# Altium PCB Main-Controller-Board-PCB.PcbDoc (part 2 of 2)
Units mm, origin at the board's own origin, x right, y up, seen from the top; angles counter-clockwise.
Board outline 97 x 32 mm, 2 copper layers (Top Layer, Bottom Layer), stack 1.57 mm thick; 70 components, 40 nets, 208 pads, 98 vias.
Unrouted connection lines stored in the file: 10.
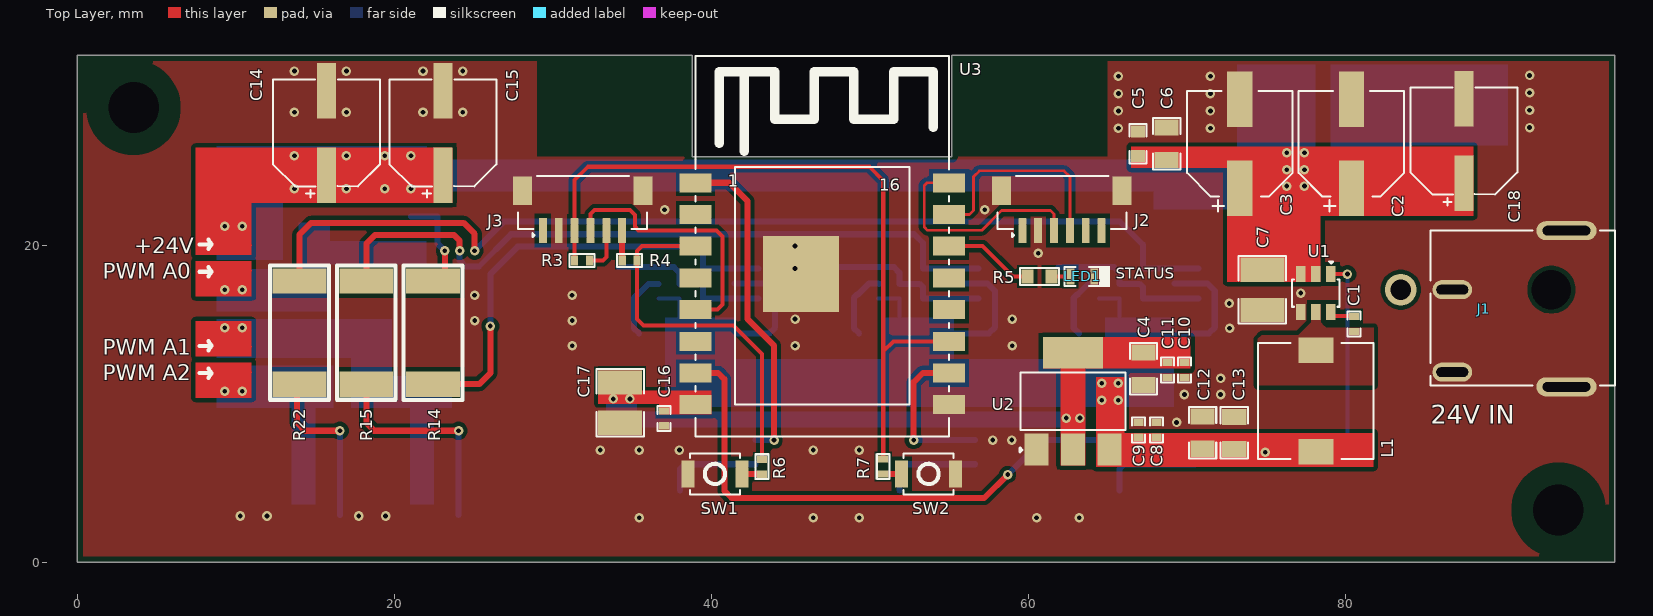
[diagram p0: Top Layer view]

## Via types
v1: diameter 0.6, hole 0.3, Top Layer to Bottom Layer, 98 vias

## Nets (pads, with @x,y where several pads share a name; then routed paths per layer and width w, separated by ;. In a path a pad name is that pad's centre, name@x,y a point inside that pad or via, vN(x,y) a via of type N, cw(c..) or ccw(c..) an arc to the next point about the centre after c; other vN are vias at no path point) (continued)
NetQ2_2: (continued)
  Bottom Layer w0.381: v1(24.134,19.66) 24.134,19.057 24.524,18.667 25.35,18.667 27.383,20.7 52.806,20.7 53.36,20.146 Q2.2 Q6.2
NetQ3_1: Q3.1 R8.1 U5.6 | length 4.4
  Bottom Layer w0.381: U5.6 35.117,14.782 Q3.1@35.117,16.683 ; R8.1 36.057,17.573 35.386,16.903 35.336,16.903 Q3.1@35.117,16.683 ; Q3.1@35.117,16.683 Q3.1 Q3.1@35.117,16.683
NetQ4_1: Q4.1 R10.1 U6.6 | length 4.5
  Bottom Layer w0.381: U6.6 48.993,14.782 Q4.1@48.993,16.683 ; R10.1@50.573,17.573 50.549,17.597 49.957,17.597 49.262,16.903 49.212,16.903 Q4.1@48.993,16.683 ; Q4.1@48.993,16.683 Q4.1 Q4.1@48.993,16.683
NetQ7_1: Q7.1 Q9.3 Q11.1 R17.1 | length 10.5
  Bottom Layer w0.381: Q9.3 65.398,18.633 65.748,18.284 65.748,17.573 67.023,17.573 67.236,17.36 Q7.1 Q11.1
NetQ7_2: Q7.2 Q11.2 R22.1 | length 64.2
  Top Layer w0.381: R22.1 14.024,20.679 14.763,21.418 24.377,21.418 25.07,20.726 v1(25.07,19.66)
  Bottom Layer w0.381: v1(25.07,19.66) 26.903,21.493 65.784,21.493 67.236,20.041 Q7.2 Q11.2
NetQ9_1: Q9.1 R16.1 U7.6 | length 4.5
  Bottom Layer w0.381: U7.6 62.868,14.782 Q9.1@62.868,16.683 ; R16.1 64.425,17.597 63.832,17.597 63.138,16.903 63.088,16.903 Q9.1@62.868,16.683 ; Q9.1@62.868,16.683 Q9.1 Q9.1@62.868,16.683
NetR6_2: R6.2 SW1.1 | length 1.3
  Top Layer w0.381: SW1.1 41.95,5.565 R6.2
NetR7_2: R7.2 SW2.1 | length 1.2
  Top Layer w0.381: R7.2 SW2.1
NetR12_2: R12.2 U5.2 | length 6.2
  Bottom Layer w0.381: U5.2@38.031,4.542 38.031,5.895 38.328,6.192 R12.2
NetR13_2: R13.2 U6.2 | length 6.2
  Bottom Layer w0.381: U6.2 51.872,5.895 52.169,6.192 R13.2
NetR20_2: R20.2 U7.2 | length 6.2
  Bottom Layer w0.381: U7.2 65.748,5.895 66.045,6.192 R20.2
PWM_0: R12.1 U3.1 | length 20.7
  Top Layer w0.381: U3.1 41.125,23.948 42.291,22.782 42.291,15.343 43.967,13.667 v1(43.967,7.716)
  Bottom Layer w0.381: R12.1 v1(43.967,7.716)
PWM_1: R13.1 U3.10 | length 10
  Top Layer w0.381: v1(52.772,7.716) 52.772,11.375 53.345,11.948 U3.10
  Bottom Layer w0.381: v1(52.772,7.716) R13.1
PWM_2: R20.1 U3.7 | length 40.4
  Top Layer w0.381: U3.7 40.436,11.948 40.823,11.561 40.823,4.515 41.277,4.062 57.219,4.062 v1(58.699,5.542)
  Bottom Layer w0.381: v1(58.699,5.542) 60.874,7.716 R20.1
PWM_A0: "PWM A0.1" Q8.2 Q8.4
  other v1: 9.317,17.194 10.418,17.194
PWM_A1: "PWM A1.1" Q10.2 Q10.4
  other v1: 9.317,14.806 10.418,14.806
PWM_A2: "PWM A2.1" Q12.2 Q12.4
  other v1: 9.317,10.794 10.418,10.794
PWM_D0: Q8.1 R14.2 R18.1 | length 6.3
  Top Layer w0.381: R14.2 22.588,17.747 23.198,18.357 v1(23.198,19.66)
  Bottom Layer w0.381: Q8.1 R18.1 22.728,20.13 v1(23.198,19.66)
PWM_D1: Q10.1 R15.2 R19.1 | length 13.8
  Top Layer w0.381: R15.2 18.24,8.803 18.737,8.306 v1(24.059,8.306)
  Bottom Layer w0.381: R19.1 Q10.1 v1(24.059,8.306)
PWM_D2: Q12.1 R21.1 R22.2 | length 10.8
  Top Layer w0.381: R22.2 13.868,11.092 13.868,8.803 14.365,8.306 v1(16.578,8.306)
  Bottom Layer w0.381: R21.1 Q12.1 v1(16.578,8.306)
RX_LOG: J3.4 U3.5 | length 16.7
  Top Layer w0.254: J3.4 32.383,21.969 32.645,22.231 34.871,22.231 35.188,21.914 35.188,21.18 35.425,20.943 40.318,20.943 40.705,20.556 40.705,16.267 40.386,15.948 U3.5
SER_RX: J2.4 U3.15 | length 13.6
  Top Layer w0.178: U3.15 56.284,21.948 56.543,22.207 56.543,24.329 56.915,24.701 62.251,24.701 62.623,24.329 J2.4
SER_TX: J2.3 U3.16 | length 14.2
  Top Layer w0.178: U3.16 53.615,23.948 53.442,23.774 53.442,21.158 53.652,20.948 57.062,20.948 58.31,22.196 61.41,22.196 61.623,21.982 J2.3
STAT_LED: R5.1 U3.14 | length 5.7
  Top Layer w0.254: U3.14 57.12,19.948 59.031,18.038 R5.1
TX_LOG: J3.3 R3.1 R7.1 U3.11 | length 47.2
  Top Layer w0.254: R3.1 J3.3 31.383,24.113 32.228,24.958 49.971,24.958 50.851,24.078 50.851,13.31 ; R7.1 50.851,13.31 ; U3.11 51.489,13.948 50.851,13.31
pads on no net: J1.MH J2.1 J2.5 J2.6 J3.1 U3.2 U3.4 U3.6 U3.12 U3.13 U5.1 U5.4 U6.1 U6.4 U7.1 U7.4

## Polygon pours and split planes (outlines as drawn)
GND on Top Layer "NONET_L-01_P-001" (solid, remove dead copper, pour order 72): 0,0 0,32 38.807,32 38.807,25.604 55.186,25.604 55.186,32 97.003,32 97.003,0
NetC1_1 on Top Layer "NONET_L-01_P-001" (solid, pour order 70): 77.838,16.291 78.438,16.291 78.438,15.15 78.788,14.8 81.788,14.8 81.788,11.152 81.781,11.16 74.488,11.16 74.488,14.098 74.733,14.343 77.031,14.343 77.838,15.15
GND on Bottom Layer "NONET_L-01_P-001" (solid, remove dead copper, pour order 71): 0,0 0,32 38.807,32 38.807,25.604 55.186,25.604 55.186,32 97.003,32 97.003,0
NetD1_1 on Bottom Layer "NONET_L-01_P-001" (solid, pour order 69): 81.356,15.511 81.356,23.343 85.242,23.343 85.242,25.825 90.272,25.825 90.272,18.517 85.432,18.517 85.09,18.175 85.09,15.511

## Other copper
Top Layer:
  rectangle net PWM_A2: 7.468,10.366 11.016,12.6
  rectangle net PWM_A1: 7.468,13 11.016,15.234
  rectangle net PWM_A0: 7.468,16.766 11.016,19
  rectangle net DC_24V: 7.468,19.396 11.016,26.175
  rectangle net 3V3: 32.854,10.007 40.003,10.833
  rectangle net 3V3: 36.711,9.327 40.003,10.833
  rectangle net 3V3: 32.854,10.007 35.648,12.114
  rectangle net DC_24V: 7.468,22.675 23.676,26.175
  rectangle net 5V: 64.257,6.018 66.064,11.709
  rectangle net 3V3: 62.023,6.117 63.619,14.217
  rectangle net 3V3: 60.923,12.217 70.231,14.217
  rectangle net 5V: 64.373,6.018 81.788,8.153
  rectangle net DC_24V: 66.479,24.883 74.727,26.225
  rectangle net DC_24V: 72.55,17.691 78.438,26.225
  rectangle net DC_24V: 72.55,21.857 88.073,26.225
  pour cut-out: 96.455,3.311 ccw(c93.455,3.311) 93.455,6.311 ccw(c93.455,3.311) 90.455,3.311 ccw(c93.455,3.311) 93.455,0.311 ccw(c93.455,3.311)
  pour cut-out: 0.548,28.689 ccw(c3.548,28.689) 3.548,25.689 ccw(c3.548,28.689) 6.548,28.689 ccw(c3.548,28.689) 3.548,31.689 ccw(c3.548,28.689)
Bottom Layer:
  rectangle net DC_24V: 8.78,19.07 12.979,26.264
  rectangle net NetD1_2: 79.065,26.296 90.272,31.42
  rectangle net DC_24V: 8.865,23.402 73.286,25.4
  rectangle net DC_24V: 8.78,22.949 22.06,26.264
  rectangle net 3V3: 33.377,8.518 63.616,9.512
  rectangle net 3V3: 33.377,8.7 35.32,10.752
  rectangle net PWM_A1: 17.272,9.75 23.659,11.75
  rectangle net 5V: 64.848,9.802 69.188,15.443
  rectangle net 5V: 50.972,9.805 55.312,15.443
  rectangle net 5V: 37.096,9.802 41.436,15.443
  rectangle net 5V: 37.096,9.802 69.188,12.827
  region net PWM_A2: 13.528,11.75 13.528,3.65 15.028,3.65 15.028,11.75
  region net PWM_A1: 21.009,11.75 21.009,3.65 22.509,3.65 22.509,11.75
  rectangle net PWM_A0: 13.954,18.778 22.054,20.278
  rectangle net PWM_A0: 13.954,16.301 15.954,21.428
  rectangle net PWM_A0: 8.78,15.812 15.954,18.507
  rectangle net PWM_A2: 8.78,9.75 16.178,12.414
  rectangle net PWM_A1: 17.272,9.75 19.859,15.37
  rectangle net PWM_A1: 8.78,12.9 19.859,15.37
  rectangle net PWM_A0: 13.954,16.301 15.954,21.428
  rectangle net DC_24V: 67.908,22.267 77.368,25.39
  region net DC_24V: 78.13,31.42 73.154,31.42 73.154,22.267 78.13,22.267
  rectangle net NetD1_2: 79.065,23.965 84.096,31.42
  pour cut-out: 96.471,3.327 ccw(c93.471,3.327) 93.471,6.327 ccw(c93.471,3.327) 90.471,3.327 ccw(c93.471,3.327) 93.471,0.327 ccw(c93.471,3.327)
  pour cut-out: 0.532,28.673 ccw(c3.532,28.673) 3.532,25.673 ccw(c3.532,28.673) 6.532,28.673 ccw(c3.532,28.673) 3.532,31.673 ccw(c3.532,28.673)
  pour cut-out: 81.354,22.016 78.13,22.016 78.13,23.965 81.354,23.965
Multi-Layer:
  pour cut-out: 55.186,25.604 55.186,32 65.003,32 65.003,25.604
  pour cut-out: 29.005,25.604 38.807,25.604 38.807,32 29.005,32

## Silkscreen, mask and mechanical layers (free items; w line width, h text height)
Top Overlay:
  lines w0.254: 7.722,11.934 8.487,11.934 ; 7.722,13.666 8.487,13.666 ; 7.722,18.334 8.487,18.334 ; 7.722,20.066 8.487,20.066 ; 8.283,11.643 8.487,11.934 ; 8.283,12.225 8.487,11.934 ; 8.283,13.375 8.487,13.666 ; 8.283,13.957 8.487,13.666 ; 8.283,18.043 8.487,18.334 ; 8.283,18.625 8.487,18.334 ; 8.283,19.775 8.487,20.066 ; 8.283,20.357 8.487,20.066
  text "STATUS" at 65.533,17.64 h1.2
  text "24V IN" at 85.377,8.341 h2
Board Outline:
  the board outline again, w0.127
Fabrication:
  drawing of 191 lines, arcs and shapes, not listed
  text "Layer" at 113.471,29.947 h1.52
  text "Name" at 123.882,29.947 h1.52
  text "Material" at 147.498,29.947 h1.52
  text "Thickness" at 169.336,29.947 h1.52
  text "Constant" at 185.842,29.947 h1.52
  text "Board Layer Stack" at 200.316,29.947 h1.52
  text "Top Overlay" at 123.882,26.899 h1.52
  text "Top Solder" at 123.882,23.851 h1.52
  text "Solder Resist" at 147.498,23.851 h1.52
  text "0.010mm" at 169.336,23.851 h1.52
  text "3.5" at 185.842,23.851 h1.52
  text "1" at 113.471,20.803 h1.52
  text "Top Layer" at 123.882,20.803 h1.52
  text "0.035mm" at 169.336,20.803 h1.52
  text "Dielectric 1" at 123.882,17.755 h1.52
  text "FR-4" at 147.498,17.755 h1.52
  text "1.500mm" at 169.336,17.755 h1.52
  text "4.8" at 185.842,17.755 h1.52
  text "2" at 113.471,14.707 h1.52
  text "Bottom Layer" at 123.882,14.707 h1.52
  text "0.035mm" at 169.336,14.707 h1.52
  text "Bottom Solder" at 123.882,11.659 h1.52
  text "Solder Resist" at 147.498,11.659 h1.52
  text "0.010mm" at 169.336,11.659 h1.52
  text "3.5" at 185.842,11.659 h1.52
  text "Bottom Overlay" at 123.882,8.611 h1.52
  text "Total board thickness:" at 113.471,5.563 h1.52
  text "1.590mm" at 169.336,5.563 h1.52
Drill Drawing:
  circle w0.254: c1.387,65.996 r0.847
  lines w0.254: 0.541,57.53 0.541,57.953 0.964,58.376 0.541,58.8 0.541,59.223 0.964,59.223 1.387,58.8 1.811,59.223 2.234,59.223 2.234,58.8 1.811,58.376 2.234,57.953 2.234,57.53 1.811,57.53 1.387,57.953 0.964,57.53 0.541,57.53 ; 0.541,61.763 0.964,61.763 0.964,61.34 1.811,61.34 1.811,61.763 2.234,61.763 2.234,62.61 1.811,62.61 1.811,63.033 0.964,63.033 0.964,62.61 0.541,62.61 0.541,61.763 ; 0.541,68.96 1.387,69.383 2.234,68.96 1.811,69.806 2.234,70.653 1.387,70.23 0.541,70.653 0.964,69.806 0.541,68.96 ; 0.541,72.77 2.234,72.77 2.234,74.463 0.541,74.463 0.541,72.77 ; 0.541,77.003 0.964,77.003 1.387,76.58 1.811,77.003 2.234,77.003 1.811,77.426 2.234,77.85 1.811,77.85 1.387,78.273 0.964,77.85 0.541,77.85 0.964,77.426 0.541,77.003
  lines w0.381: -0.978,56.387 351.271,56.387 ; -0.978,79.247 351.271,79.247 ; 13.014,52.577 13.014,83.057 ; 27.996,52.577 27.996,83.057 ; 57.198,52.577 57.198,83.057 ; 70.047,52.577 70.047,83.057 ; 88.686,52.577 88.686,83.057 ; 126.774,52.577 126.774,83.057 ; 141.756,52.577 141.756,83.057 ; 160.7,52.577 160.7,83.057 ; 197.773,52.577 197.773,83.057 ; 219.458,52.577 219.458,83.057 ; 253.332,52.577 253.332,83.057 ; 287.205,52.577 287.205,83.057 ; 315.645,52.577 315.645,83.057 ; -0.978,52.577 351.271,52.577 351.271,83.057 -0.978,83.057 -0.978,52.577
  text "Symbol" at 1.308,80.39 h1.83
  text "Count" at 14.157,80.39 h1.83
  text "Hole Size" at 29.139,80.39 h1.83
  text "Plated" at 58.341,80.39 h1.83
  text "Hole Type" at 71.19,80.39 h1.83
  text "Drill Layer Pair" at 89.829,80.39 h1.83
  text "Via/Pad" at 127.917,80.39 h1.83
  text "Pad Shape" at 142.899,80.39 h1.83
  text "Template" at 161.843,80.39 h1.83
  text "Description" at 198.916,80.39 h1.83
  text "Hole Tolerance (+)" at 220.601,80.39 h1.83
  text "Hole Tolerance (-)" at 254.475,80.39 h1.83
  text "Hole Length" at 288.348,80.39 h1.83
  text "Routed Path Length" at 316.788,80.39 h1.83
  text "1" at 14.157,76.58 h1.52
  text "1.300mm (51.18mil)" at 29.139,76.58 h1.52
  text "PTH" at 58.341,76.58 h1.52
  text "Round" at 71.19,76.58 h1.52
  text "Top Layer - Bottom Layer" at 89.829,76.58 h1.52
  text "Pad" at 127.917,76.58 h1.52
  text "Rounded" at 142.899,76.58 h1.52
  text "c200h130o0_0m205mx205p0" at 161.843,76.58 h1.52
  text "-" at 288.348,76.58 h1.52
  text "-" at 316.788,76.58 h1.52
  text "1" at 14.157,72.77 h1.52
  text "2.500mm (98.43mil)" at 29.139,72.77 h1.52
  text "NPTH" at 58.341,72.77 h1.52
  text "Round" at 71.19,72.77 h1.52
  text "Top Layer - Bottom Layer" at 89.829,72.77 h1.52
  text "Pad" at 127.917,72.77 h1.52
  text "Rounded" at 142.899,72.77 h1.52
  text "c0hn250o0_0m5mx5p0" at 161.843,72.77 h1.52
  text "-" at 288.348,72.77 h1.52
  text "-" at 316.788,72.77 h1.52
  text "2" at 14.157,68.96 h1.52
  text "0.600mm (23.62mil)" at 29.139,68.96 h1.52
  text "PTH" at 58.341,68.96 h1.52
  text "Slot" at 71.19,68.96 h1.52
  text "Top Layer - Bottom Layer" at 89.829,68.96 h1.52
  text "Pad" at 127.917,68.96 h1.52
  text "Rounded" at 142.899,68.96 h1.52
  text "(Mixed)" at 161.843,68.96 h1.52
  text "2.000mm (78.74mil)" at 288.348,68.96 h1.52
  text "1.400mm (55.12mil)" at 316.788,68.96 h1.52
  text "2" at 14.157,65.15 h1.52
  text "0.600mm (23.62mil)" at 29.139,65.15 h1.52
  text "PTH" at 58.341,65.15 h1.52
  text "Slot" at 71.19,65.15 h1.52
  text "Top Layer - Bottom Layer" at 89.829,65.15 h1.52
  text "Pad" at 127.917,65.15 h1.52
  text "Rounded" at 142.899,65.15 h1.52
  text "(Mixed)" at 161.843,65.15 h1.52
  text "3.000mm (118.11mil)" at 288.348,65.15 h1.52
  text "2.400mm (94.49mil)" at 316.788,65.15 h1.52
  text "2" at 14.157,61.34 h1.52
  text "3.200mm (125.98mil)" at 29.139,61.34 h1.52
  text "PTH" at 58.341,61.34 h1.52
  text "Round" at 71.19,61.34 h1.52
  text "Top Layer - Bottom Layer" at 89.829,61.34 h1.52
  text "Pad" at 127.917,61.34 h1.52
  text "Rounded" at 142.899,61.34 h1.52
  text "c0h320" at 161.843,61.34 h1.52
  text "-" at 288.348,61.34 h1.52
  text "-" at 316.788,61.34 h1.52
  text "98" at 14.157,57.53 h1.52
  text "0.300mm (11.81mil)" at 29.139,57.53 h1.52
  text "PTH" at 58.341,57.53 h1.52
  text "Round" at 71.19,57.53 h1.52
  text "Top Layer - Bottom Layer" at 89.829,57.53 h1.52
  text "Via" at 127.917,57.53 h1.52
  text "Rounded" at 142.899,57.53 h1.52
  text "v60h30" at 161.843,57.53 h1.52
  text "-" at 288.348,57.53 h1.52
  text "-" at 316.788,57.53 h1.52
  text "106 Total" at 14.157,53.72 h1.52
  text "Slot definitions :" at 1.308,50.037 h1.52
  text "Routed Path Length" at 27.538,50.037 h1.52
  text "= Calculated from tool start centre position to tool end centre position." at 55.546,50.037 h1.52
  text "Hole Length" at 27.538,47.498 h1.52
  text "= Routed Path Length + Tool Size = Slot length as defined in the PCB layout" at 45.136,47.498 h1.52

## Dimensions
97.003,32 to 97.003,0 on Dimensions
0,32 to 97.003,32 on Dimensions

## Text inside footprints (layer, text, board x,y; h text height)
U3: Top Overlay "1" at 41.035,23.683 h0.76; Top Overlay "16" at 50.585,23.454 h0.76